# Altium PCB ESP32_S3_TypeC.PcbDoc (part 2 of 2)
Units mil, origin at the board's own origin, x right, y up, seen from the top; angles counter-clockwise.
Board outline 2950 x 1300 mil, 2 copper layers (Top Layer, Bottom Layer), stack 86.615 mil thick; 51 components, 70 nets, 263 pads, 197 vias.
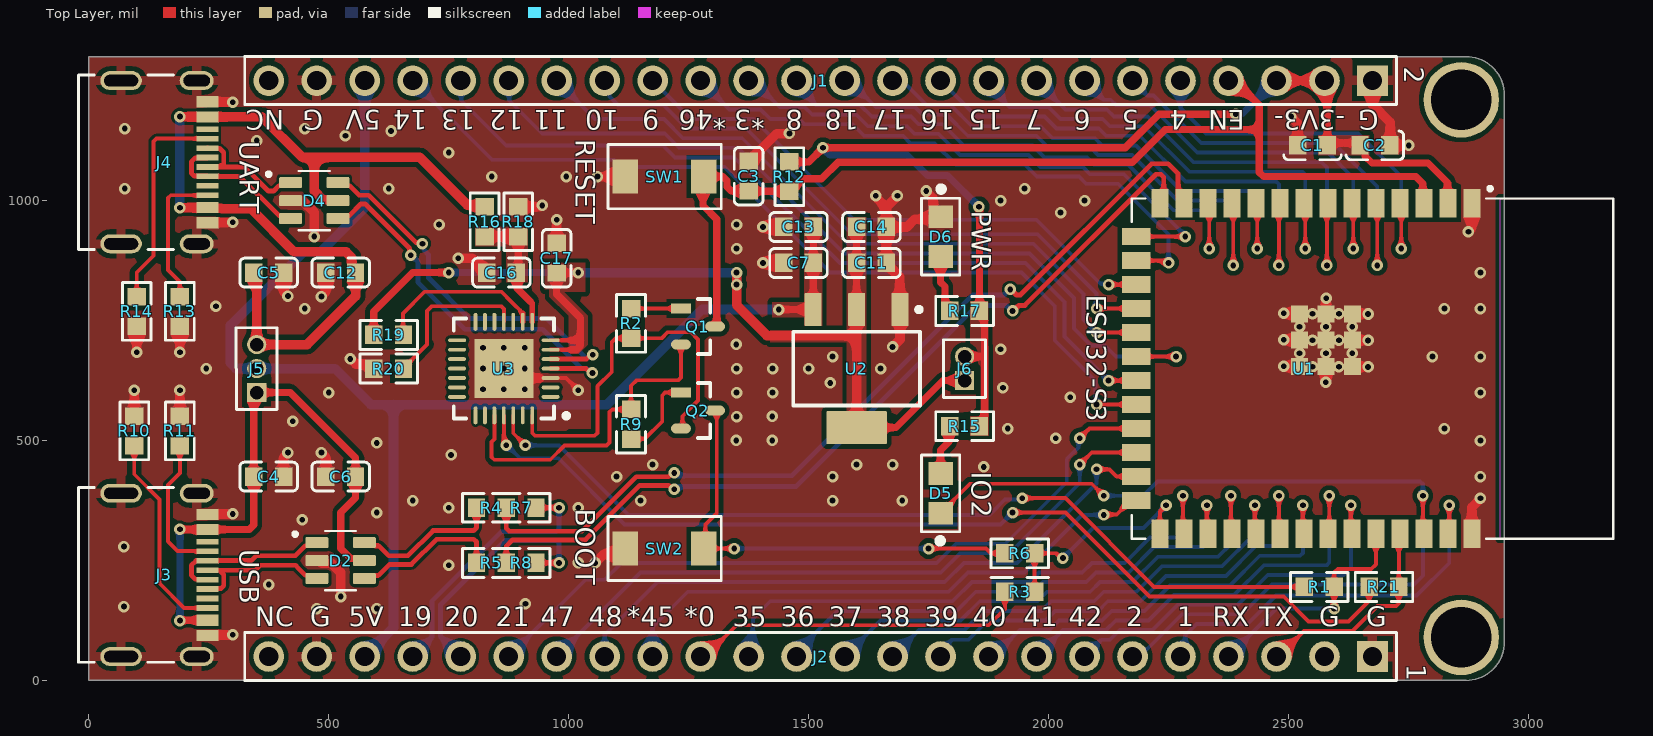
[diagram p0: Top Layer view]

## Via types
v1: diameter 24, hole 12, Top Layer to Bottom Layer, tented both sides, 197 vias

## Nets (pads, with @x,y where several pads share a name; then routed paths per layer and width w, separated by ;. In a path a pad name is that pad's centre, name@x,y a point inside that pad or via, vN(x,y) a via of type N, cw(c..) or ccw(c..) an arc to the next point about the centre after c; other vN are vias at no path point) (continued)
GND: (continued)
  Top Layer w20: R10.1 v1(95,605) ; v1(100,684) R14.1 ; R11.1 v1(190,605) ; v1(190,684) R13.1 ; J4.B1A12 248.17,954.47 299.47,954.47 v1(300,955) ; J4.A1B12 248.09,1205.45 299.55,1205.45 v1(300,1205) ; J3.B1A12@248.17,94.63 v1@299.47,94.63 ; J3.A1B12@248.17,346.59 v1@299.47,346.59 ; C4.2 406,464.92 415,473.92 v1(415,475) ; C5.2 406,810.08 v1(415,801.08) ; D4.2 422.2,998.39 446.82,998.39 470,975.21 v1(470,925) ; D2.2 483.39,250 485,248.39 485,245 485.79,244.21 505.99,244.21 525,225.21 v1(525,175) ; v1(485,475) 485,473.92 494,464.92 C6.2 ; v1(485,800) 485,801.08 494,810.08 C12.2 ; v1(545,670) 546.08,670 556.79,659.29 585.89,659.29 594,651.18 R20.2 ; v1(770,880) 799,880 819.71,859.29 820.89,859.29 829,851.18 C16.1 ; v1(865,650) 885,630 940,630 ; R18.1 940.92,987 943.92,990 v1(945,990) ; C17.1 v1(975,960) ; v1(1055,245) 1073.45,263.45 1106.76,263.45 SW2.1 ; v1(1060,1050) SW1.1 SW1.1@1120.31,1052 ; C3.1 1376.18,1082 1433.42,1139.23 1459.23,1139.23 v1(1460,1140) ; v1(1640,1010) 1640,1008.92 1642,1006.92 1642,1005.85 1662,985.85 ; C14.1@1661.78,944.78 1704.78,944.78 1721.13,961.13 1759.79,961.13 D6.2@1765,966.34 ; C14.1@1662,944.57 C11.1 1662,868.82 1690,840.82 1690,773.58 U2.1 1690.55,710.55 v1(1675,695) ; C14.1 1662,985.85 ; v1(1685,1010) 1662,987 1662,985.85 ; v1(1745,1020) 1745,1018.92 1759.41,1004.51 1759.41,979.96 1773.03,966.34 D6.2 ; v1(2490,655) 2490.53,654.47 2522.59,654.47 U1.GND@2522.89,654.76 ; v1(2490,710) 2490.47,709.53 2522.53,709.53 U1.GND@2522.89,709.88 ; v1(2490,765) 2490.41,764.59 2522.62,764.59 U1.GND@2523.03,764.17 ; v1(2505,1175) 2519,1161 C1.1 ; v1@2578.15,621.88 U1.GND@2578.15,653.94 ; U1.GND@2578.15,764.17 v1@2578.15,796.23 ; U1.GND@2633.27,653.94 v1@2665.33,653.94 ; U1.GND@2633.27,709.06 v1@2665.33,709.06 ; U1.GND@2633.27,764.17 v1@2665.33,764.17 ; J1.1 2675,1200 2712,1163 2712,1125.19 2718.35,1118.83 C2.1@2720.12,1118.83 ; C2.1 v1(2750.49,1115) ; v1(2875,935) 2875,936.08 2882.09,943.17 U1.GND@2882.09,994.49 ; U1.GND@2882.09,305.51 2882.09,361 2900,378.92 v1(2900,380)
  Top Layer w25: v1(1405,870) C7.1 ; v1(1405,945) C13.1
  other v1: 300,95.16 475,150 600,150 73.26,154.03 909.95,160.09 375,200 750,240 1020,245 73.26,279.03 445,335 300,347.13 600,350 750,360 1020,360 675,375 1150,375 1550,375 1695,375 1100,425 1550,425 2900,425 1865,445 1175,450 1600,450 1675,450 755,470 600,495 1349.34,500.17 1424.34,500.17 2900,500 2015,505 1915,525 2825,525 425,540 1350,550 1424.34,550.17 2045,590 500,600 1350,600 1425,600 2900,600 821.69,606.69 865,606.69 908.31,606.69 1905,610 1545,620 2577.68,621.41 245,650 821.69,650 908.31,650 1350,650 1425,650 1500,650 1650,650 2665.8,653.46 2550,654 2605,654 1550,675 2800,675 2900,675 2523,682 2578,682 2633,682 1900,690 821.69,693.31 865,693.31 908.31,693.31 1349.34,700.17 2550,709 2605,709 2665.8,708.58 2523,737 2578,737 2633,737 2550,764 2605,764 2665.8,763.7 450,775 2825,775 2900,775 265,780 2578.62,796.7 2900,850 1350,900 730,950 1350,950 2025,975 1900,1000 2075,1000 75,1025 625,1025 1950,1025 840,1050 995,1050 750,1100 350,1125 535,1135 630,1145 75,1150 450,1150
GPIO0: R3.2 R6.2 U1.27 | length 476.3
  Top Layer w8: R3.2 R6.2 2016.21,265 2026.21,255 v1(2030,255) ; U1.27@2226.57,300 U1.27 2232.09,352.09 v1(2245,365)
  Bottom Layer w8: v1(2030,255) 2093,318 2198,318 v1(2245,365)
GPIO1: J2.5 U1.39 | length 842
  Top Layer w8: U1.39 2835,308.43 v1(2835,365)
  Bottom Layer w8: J2.5 2285,60 2285,95 2308,118 2414.72,118 2473.72,177 2767,177 2835,245 v1(2835,365)
GPIO2: D5.2 J2.6 U1.38 | length 2001.5
  Top Layer w8: D5.2 1836.34,410 2090,410 v1(2115,385) ; v1(2780,385) 2780,307.6 U1.38
  Bottom Layer w8: v1(2115,385) 2196.82,385 2226.82,415 2774.14,415 2780,409.14 2780,218.28 2761.72,200 2465,200 2403,138 2278,138 2205.73,65.73 2205.35,65.73 2189.61,50 J2.6
GPIO3: J1.14 U1.15 | length 1147.9
  Top Layer w8: U1.15 v1(2285,925)
  Bottom Layer w8: J1.14 1385,1250 1440,1195 1491.72,1195 1507.49,1179.22 1599.21,1179.22 1623.43,1155 1705.15,1155 1720.93,1139.22 1770.93,1139.22 1815.15,1095 1958.58,1095 1983.58,1070 2071.62,1070 2086.62,1055 2157.01,1055 2285,927.01 v1(2285,925)
GPIO4: J1.5 U1.4 | length 821.8
  Top Layer w8: U1.4 2735,991.57 v1(2735,900)
  Bottom Layer w8: J1.5 2275,1193.28 2328.28,1140 2645,1140 2735,1050 v1(2735,900)
GPIO5: J1.6 U1.5 | length 896.3
  Top Layer w8: U1.5 2685,991.57 v1(2685,865)
  Bottom Layer w8: J1.6 2205.78,1219.22 2219.06,1219.22 2318.28,1120 2594.14,1120 2685,1029.14 v1(2685,865)
GPIO6: J1.7 U1.6 | length 887
  Top Layer w8: U1.6 2632.09,992.91 2635,990 v1(2635,900)
  Bottom Layer w8: J1.7 2115,1210 2129.61,1210 2140.39,1199.22 2210.78,1199.22 2310,1100 2582.43,1100 2635,1047.43 v1(2635,900)
GPIO7: J1.8 U1.7 | length 1014.4
  Top Layer w8: v1(2580,865) 2580,992.4 U1.7
  Bottom Layer w8: J1.8 2022.88,1202.12 2035,1190 2121.33,1190 2136.33,1175 2206.72,1175 2301.72,1080 2569.14,1080 2580,1069.14 v1(2580,865)
GPIO8: J1.13 U1.12 | length 1144.3
  Top Layer w8: v1(2335,900) U1.12@2335,990
  Bottom Layer w8: J1.13 1475,1240 1515.78,1199.22 1607.49,1199.22 1631.72,1175 1713.43,1175 1729.21,1159.22 1779.21,1159.22 1823.43,1115 1966.86,1115 1991.86,1090 2079.91,1090 2094.91,1075 2165.29,1075 2260.29,980 2329.14,980 2335,974.14 v1(2335,900)
GPIO9: J1.16 U1.17 | length 1183.9
  Top Layer w8: v1(2125,825) U1.17
  Bottom Layer w8: J1.16 1255,1170 1385,1170 1595,960 1975,960 2108.41,826.59 2123.41,826.59 v1(2125,825)
GPIO10: J1.17 U1.18 | length 1336.6
  Top Layer w8: v1(2100,775) U1.18
  Bottom Layer w8: J1.17 1085.33,1239.67 1085.33,1216.76 1102.87,1199.22 1197.5,1199.22 1246.72,1150 1260,1150 1370,1150 1590,930 1976.72,930 2100,806.72 v1(2100,775)
GPIO11: J1.18 U1.19 | length 1456.6
  Top Layer w8: v1(2100,725) U1.19
  Bottom Layer w8: J1.18 1055,1170 1198.43,1170 1238.43,1130 1361.72,1130 1581.72,910 1968.43,910 2073,805.43 2073,752 v1(2100,725)
GPIO12: J1.19 U1.20 | length 1772.2
  Top Layer w8: U1.20 v1(2265.75,675)
  Bottom Layer w8: J1.19 876.14,1248.86 876.14,1208.86 945,1140 1200.15,1140 1230.15,1110 1353.43,1110 1573.43,890 1960,890 2053,797 2053,733.82 2088.82,698 2117,698 2140,675 v1(2265.75,675)
GPIO13: J1.20 U1.21 | length 1732.2
  Top Layer w8: v1(2125,625) U1.21
  Bottom Layer w8: J1.20 776.14,1248.86 776.14,1208.86 870,1115 1196.86,1115 1221.86,1090 1345.15,1090 1565.15,870 1951.72,870 2033,788.72 2033,717 v1(2125,625)
GPIO14: J1.21 U1.22 | length 1856.8
  Top Layer w8: v1(2100,575) U1.22
  Bottom Layer w8: J1.21 840,1085 1095,1085 1110,1070 1325,1070 1545,850 1943.43,850 2013,780.43 2013,708.72 2098,623.72 2098,577 v1(2100,575)
GPIO15: J1.9 U1.8 | length 997.9
  Top Layer w8: U1.8 2532.09,992.91 2535,990 v1(2535,900)
  Bottom Layer w8: J1.9 1875,1238.18 1918.18,1195 2000,1195 2025,1170 2113.04,1170 2128.04,1155 2198.43,1155 2293.43,1060 2529.14,1060 2535,1054.14 v1(2535,900)
GPIO16: J1.10 U1.9 | length 1091
  Top Layer w8: v1(2480,865) U1.9@2480,992.4
  Bottom Layer w8: J1.10 1850,1175 1991.72,1175 2016.72,1150 2104.76,1150 2119.76,1135 2190.15,1135 2285.15,1040 2474.14,1040 2480,1034.14 v1(2480,865)
GPIO17: J1.11 U1.10 | length 1061.8
  Top Layer w8: v1(2435,900) U1.10@2435,990
  Bottom Layer w8: J1.11 1685.33,1239.67 1705.33,1239.67 1745.78,1199.22 1795.78,1199.22 1840,1155 1983.43,1155 2008.43,1130 2096.48,1130 2111.48,1115 2181.86,1115 2276.86,1020 2429.14,1020 2435,1014.14 v1(2435,900)
GPIO18: J1.12 U1.11 | length 1167.5
  Top Layer w8: v1(2385,865) U1.11@2385,987.4
  Bottom Layer w8: J1.12 1585,1250 1640,1195 1721.72,1195 1737.5,1179.22 1787.5,1179.22 1831.72,1135 1975.15,1135 2000.15,1110 2088.19,1110 2103.19,1095 2173.58,1095 2268.58,1000 2379.14,1000 2385,994.14 v1(2385,865)
GPIO21: J2.19 U1.23 | length 1542.6
  Top Layer w8: v1(2065,505) 2085,525 U1.23
  Bottom Layer w8: J2.19 1035,210 1075,210 1110,245 1767.01,245 1807.01,285 1909.9,285 2038,413.1 2038,461.18 2062.32,485.5 2062.32,502.32 v1(2065,505)
GPIO35: J2.14 U1.28 | length 1209.8
  Top Layer w8: v1(2280,385) 2280,307.6 U1.28
  Bottom Layer w8: J2.14 1384.09,59.09 1384.09,129.09 1420,165 1800.15,165 1840.15,205 1960.29,205 1980.29,225 2070.29,225 2090.29,245 2158.73,245 2211.73,298 2269.23,298 2280,308.77 v1(2280,385)
GPIO36: J2.13 U1.29 | length 1098.1
  Top Layer w8: v1(2330,365) 2330,307.74 U1.29@2332.12,305.63
  Bottom Layer w8: J2.13 1475,60 1560,145 1808.43,145 1848.43,185 1968.58,185 1988.58,205 2078.58,205 2098.58,225 2167.01,225 2220.01,278 2322.41,278 2330,285.59 v1(2330,365)
GPIO37: J2.12 U1.30 | length 1082.9
  Top Layer w8: v1(2380,385) 2380,307.6 U1.30
  Bottom Layer w8: J2.12 1650,125 1816.72,125 1856.72,165 1976.86,165 1996.86,185 2086.86,185 2106.86,205 2175.29,205 2228.29,258 2353.29,258 2380,284.71 v1(2380,385)
GPIO38: J2.11 U1.31 | length 980.4
  Top Layer w8: v1(2430,365) 2430,307.74 U1.31@2432.12,305.63
  Bottom Layer w8: J2.11 1730,105 1825,105 1865,145 1985.15,145 2005.15,165 2095.15,165 2115.15,185 2183.58,185 2236.58,238 2361.58,238 2423.58,300 2424.14,300 2430,305.86 v1(2430,365)
GPIO39: J2.10 U1.32 | length 989.1
  Top Layer w8: v1(2480,385) 2480,307.6 U1.32
  Bottom Layer w8: J2.10 1775,61.82 1798.18,85 1833.28,85 1873.28,125 1993.43,125 2013.43,145 2103.43,145 2123.43,165 2191.86,165 2244.86,218 2369.86,218 2431.86,280 2474.14,280 2480,285.86 v1(2480,385)
GPIO40: J2.9 U1.33 | length 903.8
  Top Layer w8: v1(2530,365) 2530,307.74 U1.33@2532.12,305.63
  Bottom Layer w8: J2.9 1885,50 1940,105 2001.72,105 2021.72,125 2111.72,125 2131.72,145 2200.15,145 2253.15,198 2378.15,198 2440.15,260 2524.14,260 2530,265.86 v1(2530,365)
GPIO41: J2.8 U1.34 | length 911
  Top Layer w8: U1.34 2585,308.43 v1(2585,385)
  Bottom Layer w8: J2.8 2030,105 2120,105 2140,125 2208.43,125 2261.43,178 2386.43,178 2448.43,240 2579.14,240 2585,245.86 v1(2585,385)
GPIO42: J2.7 U1.35 | length 813.1
  Top Layer w8: U1.35@2630,313.51 v1(2630,365)
  Bottom Layer w8: J2.7 2110,85 2128.28,85 2148.28,105 2216.72,105 2269.72,158 2394.72,158 2456.72,220 2615,220 2630,235 v1(2630,365)
GPIO45: J2.16 U1.26 | length 1178.6
  Top Layer w8: v1(2115,345) 2115.94,345.94 2142,345.94 2171.06,375 U1.26
  Bottom Layer w8: J2.16 1175,111.72 1248.28,185 1791.86,185 1831.86,225 1950,225 2070,345 v1(2115,345)
GPIO46: J1.15 U1.16 | length 1236.7
  Top Layer w8: U1.16 2241.21,875 2246.21,870 v1(2250,870)
  Bottom Layer w8: J1.15 1335,1190 1400,1190 1420,1170 1480,1170 1490.78,1159.22 1590.93,1159.22 1615.15,1135 1696.86,1135 1712.64,1119.22 1762.64,1119.22 1806.86,1075 1950.29,1075 1975.29,1050 2063.34,1050 2078.34,1035 2145,1035 2250,930 v1(2250,870)
GPIO47: J2.18 U1.24 | length 1406.3
  Top Layer w8: v1(2065,450) 2090,475 U1.24
  Bottom Layer w8: J2.18 1150,225 1775.29,225 1815.29,265 1918.18,265 2065,411.82 v1(2065,450)
GPIO48: J2.17 U1.25 | length 1319.3
  Top Layer w8: v1(2100,440) v1(2100,440) 2127,439.96 2141.96,425 U1.25
  Bottom Layer w8: J2.17 1075,95 1185,205 1783.58,205 1823.58,245 1934.57,245 2100,410.43 v1(2100,440)
NetD5_1: D5.1 R15.1 | length 106.5
  Top Layer w15: D5.1 1775,480 1792,497 1792,528 R15.1
NetJ3_A5: J3.A5 R11.2 | length 300.6
  Top Layer w8: R11.2 190,432.39 165,407.39 165,290 185,270 246.93,270 J3.A5
NetJ3_B5: J3.B5 R10.2 | length 429.6
  Top Layer w8: R10.2 95,429.69 147.5,377.19 147.5,202.5 198.82,151.18 J3.B5
NetJ4_A5: J4.A5 R14.2 | length 452.8
  Top Layer w8: R14.2 100,850 135,885 135,1123.28 140.86,1129.13 J4.A5
NetJ4_B5: J4.B5 R13.2 | length 300.6
  Top Layer w8: R13.2 190,830 165,855 165,1005.17 170.86,1011.02 J4.B5
NetQ1_1: Q1.1 R2.2 | length 103.9
  Top Layer w8: R2.2 Q1.1
NetQ2_1: Q2.1 R9.2 | length 175.8
  Top Layer w8: R9.2 1130.43,503.43 1158.43,503.43 1195,540 1195,594.14 1200.86,600 Q2.1
NetR1_1: R1.1 U3.26 | length 1847.2
  Top Layer w8: U3.26 884.68,515.31 905,495 v1(910,490) ; v1(1945,380) 2035,380 2220,195 R1.1
  Bottom Layer w8: v1(910,490) 980,490 1125,345 1876.82,345 1908.82,377 1932.14,377 1932.46,377.32 1942.32,377.32 v1(1945,380)
NetR19_2: R19.2 U3.9 | length 350
  Top Layer w8: R19.2 655,721 655,765 700,810 860,810 880,790 U3.9@904.37,765.63
  Top Layer w11: U3.9 U3.9@904.37,765.63
NetR20_1: R20.1 U3.11 | length 335.9
  Top Layer w8: R20.1 660,650 660,655.18 705,700.18 705,770 715,780 720,780 859.14,780 865,774.14 U3.11
NetR21_1: R21.1 U3.25 | length 2082.2
  Top Layer w8: U3.25 865,498.79 868.79,495 870,493.79 v1(870,490) ; v1(1925,350) 2035,350 2210,175 2490,175 2542,123 2625.04,123 2668,165.96 R21.1
  Bottom Layer w8: v1(870,490) 871.82,490 898.82,463 978.72,463 1116.72,325 1125,325 1900,325 v1(1925,350)
POWER_LED: D6.1 R17.2 | length 112.4
  Top Layer w15: D6.1 1775,830 1784,821 R17.2@1784,775
RST__CP2012: Q1.2 R9.1 U3.24 | length 692.2
  Top Layer w8: U3.24 845.31,503.48 839.14,497.3 839.14,465.86 845,460 961.67,460 991.67,490 1079.14,490 1085,495.86 1085,559.14 1090.86,565 R9.1 1130,614.14 1141.33,625.48 1228.08,625.48 1233.94,631.33 Q1.2
RXD0: J2.4 R1.2 U1.36 | length 494
  Top Layer w8: v1(2595,150) R1.2 2595,225 2602.5,232.5 2672.5,232.5 2682.09,242.09 U1.36
  Bottom Layer w8: J2.4 2475,150 v1(2595,150)
TXD0: J2.3 R21.2 U1.37 | length 453
  Top Layer w8: J2.3 2479.47,50 2532.47,103 2633.32,103 2685.32,155 2724.14,155 2730,160.86 2730,285 2740,295 2732.09,302.91 U1.37
USB_OTG_TVS_N: D2.1 J3.A7 J3.B7 | length 363.5
  Top Layer w10: J3.A7 246.77,211.1 222.4,211.1 214,219.5 214,240.34 223.58,249.92 ; D2.1 468.98,280.79 451.43,280.79 430.65,260 348.96,260 338.88,249.92 J3.B7@247.64,249.92 ; 223.58,249.92 J3.B7@247.64,249.92 ; 223.58,249.92 J3.B7@247.64,249.92
USB_OTG_TVS_P: D2.3 J3.A6 J3.B6 | length 317.4
  Top Layer w10: J3.B6 248.5,191.42 255.23,191.42 256.65,190 267.27,190 268.69,191.42 275.42,191.42 281.28,197.28 281.28,220.66 272.88,229.06 272.88,229.92 ; J3.A6 272.88,229.92 ; D2.3 468.98,219.21 451.43,219.21 436.77,233.87 436.77,234.14 430.91,240 357.24,240 347.17,229.92 272.88,229.92
USB_UART_TVS_N: D4.1 J4.A7 J4.B7 | length 271.1
  Top Layer w10: J4.A7 275,1070.08 ; J4.B7 248.5,1108.58 272.88,1108.58 281.28,1100.19 281.28,1076.35 275,1070.08 ; D4.1 413.98,1030.79 396.43,1030.79 385.65,1020 374.2,1020 324.12,1070.08 275,1070.08
USB_UART_TVS_P: D4.3 J4.A6 J4.B6 | length 306.2
  Top Layer w10: J4.B6 246.77,1051.26 219.86,1051.26 214,1057.12 214,1080.5 222.4,1088.9 246.77,1088.9 J4.A6 ; J4.B6@247.95,1050.08 314.92,1050.08 395.79,969.21 413.98,969.21 D4.3
"VBUS CP2012": C16.2 R16.1 R18.2 U3.8 | length 258.9
  Top Layer w11: 920,790 924.06,785.94 U3.8
  Top Layer w15: R18.2 895,854 C16.2 893,848 893,817 920,790
  Top Layer w20: R16.1 R18.2@891,925
VCC_5V: C7.2 C13.2 J1.22 J2.22 J5.2 U2.3 | length 2786.4
  Top Layer w15: J1.22 J1.22@580,1245 ; v1(1438.05,773.03) U2.3 1509.72,773.31 1509.72,869.72 C7.2 C13.2
  Bottom Layer w20: J2.22 635,110 635,575 ; J1.22 575,984.75 483.25,893 448,893 295,740 295,661.72 306.72,650 513.28,650 588.28,575 635,575 ; v1(1438.05,773.03) 1278.03,773.03 1080,575 1050,575 695,575 635,575
pads on no net: J1.24 J2.24 J3.A8 J3.B8 J4.A8 J4.B8 U3.1 U3.2 U3.10 U3.12 U3.13 U3.14 U3.15 U3.16 U3.17 U3.18 U3.19 U3.20 U3.21 U3.22 U3.23 U3.27

## Polygon pours and split planes (outlines as drawn)
GND on Top Layer "GND_L01_P015" (solid, remove dead copper, pour order 15): 0,0 0,1300 2870,1300 cw(c2870,1220) 2950,1220 2950,80 cw(c2870,80) 2870,0
3V3_EXT on Top Layer "Top Layer-3V3_EXT" (solid, pour order 14): 1837,510 1875,510 1875,696 1874,696 1874,789 1875,790 1837,790 1837,696 1803,696 1803,654 1859.06,654 1859.06,551.06 1859,551 1837,551
3V3_REG on Top Layer "3V3_REG_L01_P011" (solid, pour order 11): 950,870 1035,870 1035,810 990,810 1040,760 1040,700 1020,680 1000,680 1000,760 960,800 960,815 950,815
"VBUS CP2012" on Top Layer "VBUS_CP2012_L01_P010" (solid, pour order 10): 805,945 915,945 915,830 870,830 870,905 805,905
3V3_REG on Top Layer "Top Layer-3V3_REG" (solid, pour order 9): 1580,555 1620,555 1620,965 1580,965 1580,730 1420,730 1420,705 1580,705
VCC_5V on Top Layer "Top Layer-VCC_5V" (solid, pour order 6): 1491,739 1528,739 1528,965 1491,965 1491,788 1424,788 1424,757 1491,757
3V3_EXT on Top Layer "3V3_EXT_L01_P003" (solid, pour order 3): 2562,1136 2668,1136 2668,1094 2562,1094
GND on Bottom Layer "GND_L02_P016" (solid, remove dead copper, pour order 16): 0,0 0,1300 2870,1300 cw(c2870,1220) 2950,1220 2950,80 cw(c2870,80) 2870,0

## Silkscreen, mask and mechanical layers (free items; w line width, h text height)
Top Overlay:
  text "NC" at 407.32,1187.99 h40 r180
  text "G" at 488.33,1187.99 h40 r180
  text "5V" at 608.32,1187.99 h40 r180
  text "14" at 704.99,1187.99 h40 r180
  text "13" at 804.99,1187.99 h40 r180
  text "12" at 904.99,1187.99 h40 r180
  text "11" at 998.33,1187.99 h40 r180
  text "10" at 1104.99,1187.99 h40 r180
  text "9" at 1188.33,1187.99 h40 r180
  text "*46" at 1328.32,1187.99 h40 r180
  text "*3" at 1408.32,1187.99 h40 r180
  text "8" at 1488.33,1187.99 h40 r180
  text "18" at 1604.99,1187.99 h40 r180
  text "17" at 1704.99,1187.99 h40 r180
  text "16" at 1804.99,1187.99 h40 r180
  text "15" at 1904.99,1187.99 h40 r180
  text "7" at 1988.33,1187.99 h40 r180
  text "6" at 2088.33,1187.99 h40 r180
  text "5" at 2188.33,1187.99 h40 r180
  text "4" at 2288.33,1187.99 h40 r180
  text "EN" at 2408.32,1187.99 h40 r180
  text "-3V3-" at 2618.3,1187.99 h40 r180
  text "G" at 2688.33,1187.99 h40 r180
  text "RESET" at 1015.01,1128.3 h40 r270
  text "UART" at 315.01,1123.31 h40 r270
  text "PWR" at 1840.01,978.32 h40 r270
  text "ESP32-S3" at 2080.01,803.28 h40 r270
  text "IO2" at 1840.01,434.98 h40 r270
  text "BOOT" at 1015.01,358.31 h40 r270
  text "USB" at 315.01,273.32 h40 r270
  text "NC" at 346.68,113.01 h40
  text "G" at 461.67,113.01 h40
  text "5V" at 541.68,113.01 h40
  text "19" at 645.01,113.01 h40
  text "20" at 741.68,113.01 h40
  text "21" at 848.34,113.01 h40
  text "47" at 941.68,113.01 h40
  text "48" at 1041.68,113.01 h40
  text "*45" at 1121.68,113.01 h40
  text "*0" at 1241.68,113.01 h40
  text "35" at 1341.68,113.01 h40
  text "36" at 1441.68,113.01 h40
  text "37" at 1541.68,113.01 h40
  text "38" at 1641.68,113.01 h40
  text "39" at 1741.68,113.01 h40
  text "40" at 1841.68,113.01 h40
  text "41" at 1948.34,113.01 h40
  text "42" at 2041.68,113.01 h40
  text "2" at 2161.67,113.01 h40
  text "1" at 2268.34,113.01 h40
  text "RX" at 2342.68,113.01 h40
  text "TX" at 2438.68,113.01 h40
  text "G" at 2563.67,113.01 h40
  text "G" at 2661.67,113.01 h40
Bottom Overlay:
  text "NC" at 355.01,1116.67 h40 r270
  text "5V" at 550.01,1116.67 h40 r270
  text "EN" at 2355.01,1116.67 h40 r270
  text "IO9" at 1150.01,1083.35 h40 r270
  text "IO8" at 1450.01,1083.35 h40 r270
  text "IO7" at 1955.01,1083.35 h40 r270
  text "IO6" at 2055.01,1083.35 h40 r270
  text "IO5" at 2155.01,1083.35 h40 r270
  text "IO4" at 2255.01,1083.35 h40 r270
  text "GND" at 455.01,1076.68 h40 r270
  text "3V3" at 2455.01,1076.68 h40 r270
  text "3V3" at 2555.01,1076.68 h40 r270
  text "GND" at 2655.01,1076.68 h40 r270
  text "IO11" at 955.01,1063.35 h40 r270
  text "IO14" at 655.01,1050.03 h40 r270
  text "IO13" at 755.01,1050.03 h40 r270
  text "IO12" at 855.01,1050.03 h40 r270
  text "IO10" at 1055.01,1050.03 h40 r270
  text "IO18" at 1555.01,1050.03 h40 r270
  text "IO17" at 1655.01,1050.03 h40 r270
  text "IO16" at 1755.01,1050.03 h40 r270
  text "IO15" at 1855.01,1050.03 h40 r270
  text "*IO3" at 1355.01,1043.36 h40 r270
  text "*IO46" at 1255.01,1003.37 h40 r270
  text "Rev 1" at 45.01,983.36 h40 r270
  text "ESP32-S3 TYPE C" at 1914.86,720.01 h60
  text "48 pins" at 1604.96,636.67 h40
  text "<- GPIOs ->" at 420.01,443.4 h40 r270
  text "0, 3, 45, 46" at 506.67,416.74 h40 r270
  text "Strapping Pins" at 606.67,386.75 h40 r270
  text "NC" at 355.01,119.35 h40 r270
  text "GND" at 455.01,119.35 h40 r270
  text "5V" at 555.01,119.35 h40 r270
  text "IO19" at 655.01,119.35 h40 r270
  text "IO20" at 757.01,119.35 h40 r270
  text "IO21" at 857.01,119.35 h40 r270
  text "IO47" at 952.01,119.35 h40 r270
  text "IO48" at 1052.01,119.35 h40 r270
  text "*IO45" at 1155.01,119.35 h40 r270
  text "*IO0" at 1255.01,119.35 h40 r270
  text "IO35" at 1355.01,119.35 h40 r270
  text "IO36" at 1455.01,119.35 h40 r270
  text "IO37" at 1555.01,119.35 h40 r270
  text "IO38" at 1655.01,119.35 h40 r270
  text "IO39" at 1755.01,119.35 h40 r270
  text "IO40" at 1855.01,119.35 h40 r270
  text "IO41" at 1955.01,119.35 h40 r270
  text "IO42" at 2055.01,119.35 h40 r270
  text "IO2" at 2152.01,119.35 h40 r270
  text "IO1" at 2252.01,119.35 h40 r270
  text "RXD" at 2352.01,119.35 h40 r270
  text "TXD" at 2452.01,119.35 h40 r270
  text "GND" at 2557.01,119.35 h40 r270
  text "GND" at 2657.01,119.35 h40 r270
Board Shape:
  lines w20: 0,0 2822.09,0 2870,0 ccw(c2870,80) 2950,80 2950,127.91 2950,1220 ccw(c2870,1220) 2870,1300 2815.23,1300 0,1300 0,0

## Text inside footprints (layer, text, board x,y; h text height)
J1: Top Overlay "2" at 2741,1279 h40 r270
J2: Top Overlay "1" at 2746,34 h40 r270
U1: Mechanical 13 "ANTENNA" at 3049.02,827.17 h50 r270